# Altium PCB P05_ECG.PcbDoc
Units mm, origin at the board's own origin, x right, y up, seen from the top; angles counter-clockwise.
Board outline 80 x 55 mm, 2 copper layers (Top Layer, Bottom Layer); 91 components, 60 nets, 308 pads, 167 vias.
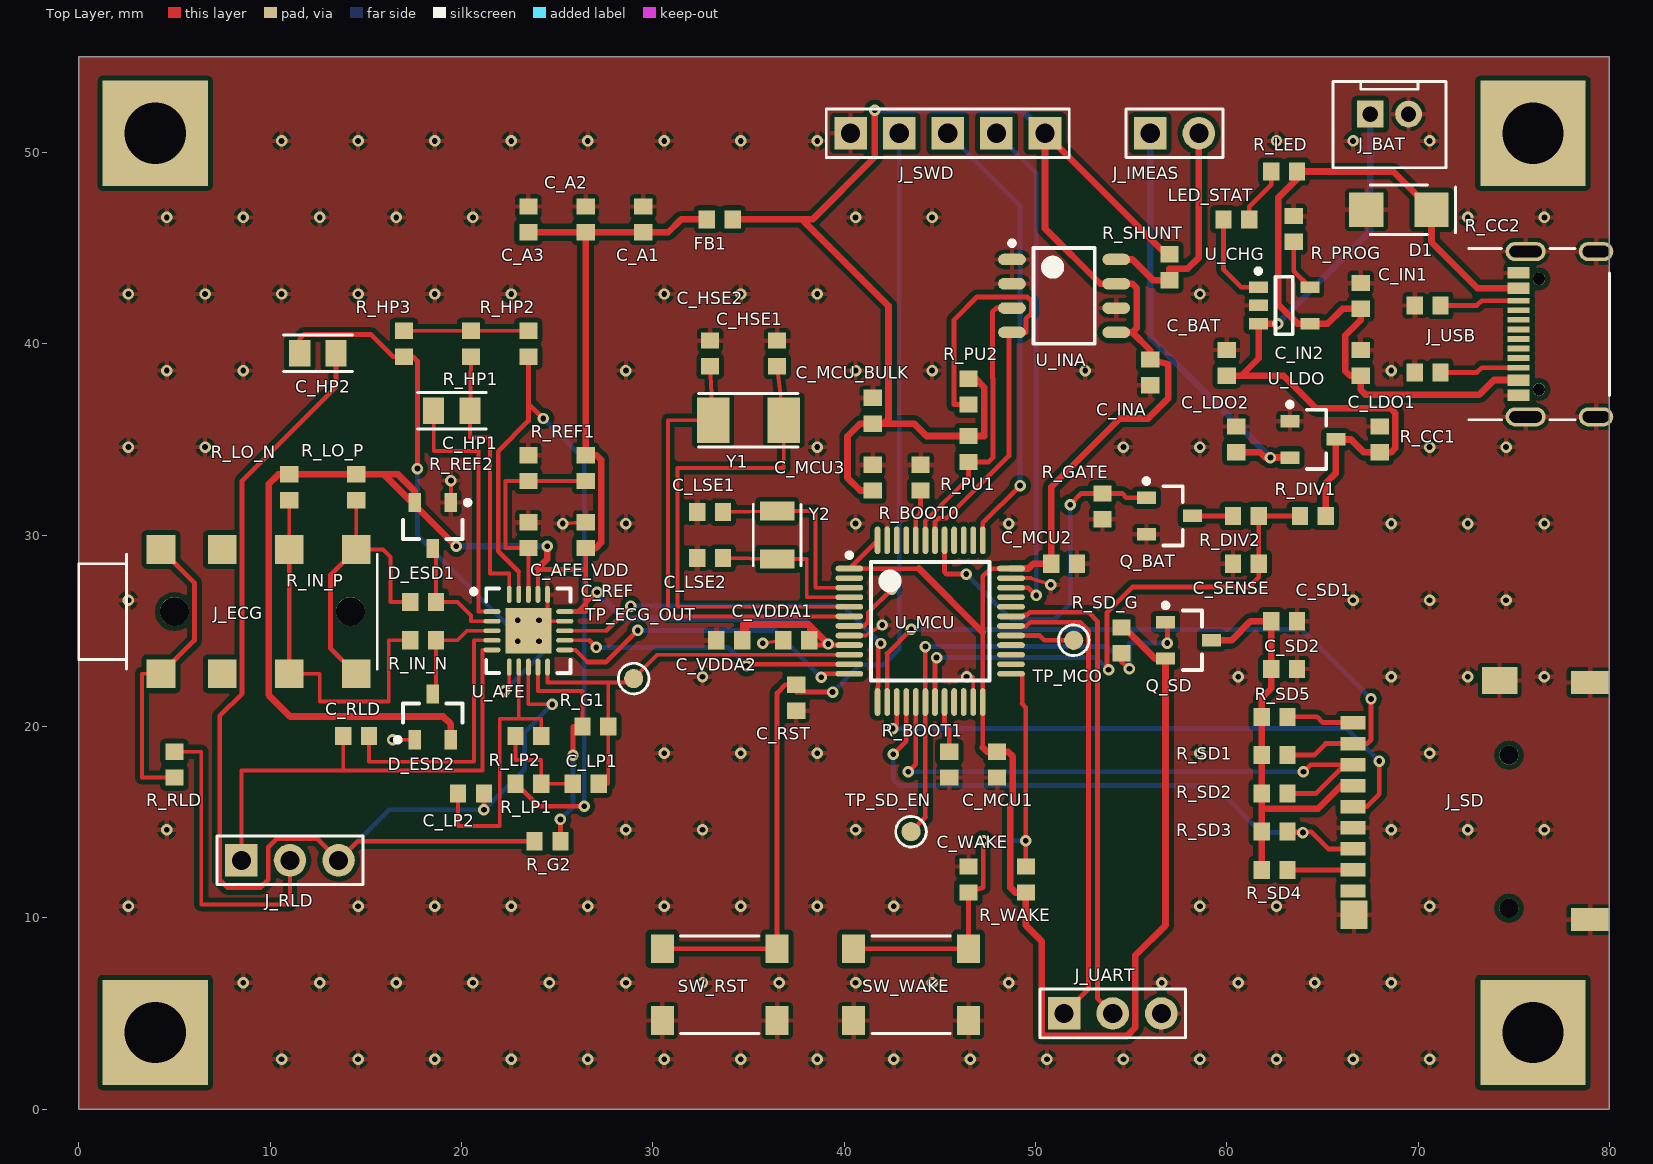
[diagram p0: Top Layer view]
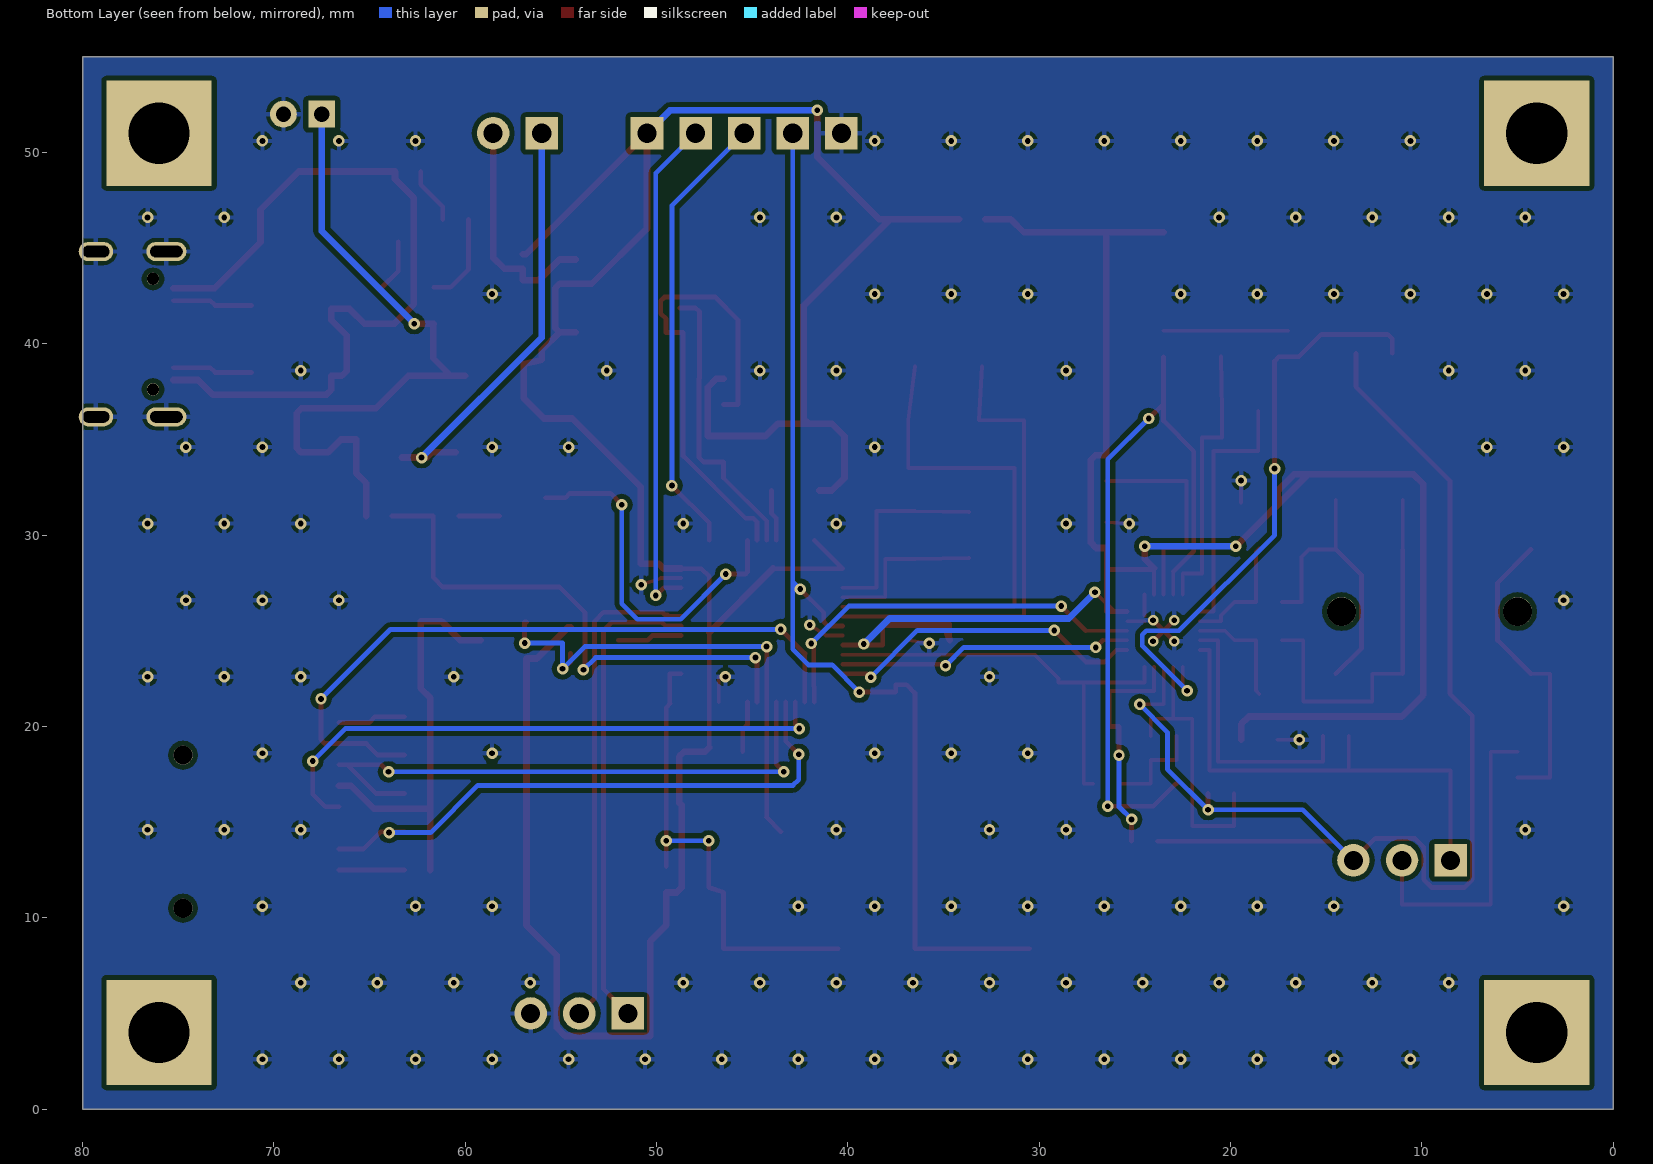
[diagram p1: Bottom Layer view, seen from below]

## Layer stack, top to bottom
Top Solder: solder mask 0.0102, Solder Resist, Dk 3.5
Top Layer: signal copper 0.0356
Dielectric 1: dielectric 0.32, FR-4, Dk 4.8
Bottom Layer: signal copper 0.0356
Bottom Solder: solder mask 0.0102, Solder Resist, Dk 3.5

## Board outline
0,0 80,0 80,55 0,55

## Design rules (kind name [scope] priority, off if disabled: settings)
Clearance [All] p1: gap=0.15 ignorepadtopadclearanceinfootprint=TRUE except(0: Arc-Hole Track-Hole SMDPad-Hole THPad-Hole Via-Hole Fill-Hole Poly-Hole Region-Hole Text-Hole; 0.25: Arc-Fill Arc-Poly Arc-Region Track-Fill Track-Poly Track-Region SMDPad-Fill SMDPad-Poly SMDPad-Region THPad-Fill THPad-Poly THPad-Region Via-Fill Via-Poly Via-Region Fill-Fill Fill-Poly Fill-Region Poly-Poly Poly-Region Region-Region)
ComponentClearance [All] p1: gap=0.2 collisioncheckmode=3 verticalgap=0.2 showdistances=FALSE
HoleSize [All] p1: absolutevalues=TRUE maxlimit=4 minlimit=0.3 maxpercent=80.000 minpercent=20.000
MinimumSolderMaskSliver [All] p1: minsoldermaskwidth=0.045
PolygonConnect [All] p1: connectstyle=Relief reliefconductorwidth=0.25 reliefentries=4 polygonreliefangle="90 Angle" airgapwidth=0.2
RoutingVias [All] p1: holewidth=0.3 width=0.6 viastyle="Through Hole" minholewidth=0.3 minwidth=0.6 maxholewidth=0.5 maxwidth=1
SilkToSilkClearance [All] p1: silktosilkclearance=0.12
SilkToSolderMaskClearance [IsPad] p1: minsilkscreentomaskgap=0.1 clearancetoexposedcopper=TRUE
SolderMaskExpansion [All] p1: expansion=0.05
Width Width_Power [InNet('VBUS') OR InNet('VBAT') OR InNet('3V3_PRE') OR InNet('3V3_IN') OR InNet('3V3_MAIN') OR InNet('3V3_SD') OR InNet('VDDA') OR InNet('GND')] p1: maxlimit=1 minlimit=0.2 preferedwidth=0.35 minimp=50.000000 maximp=50.000000 favimp=50.000000
Width [All] p2: maxlimit=1 minlimit=0.15 preferedwidth=0.25 minimp=50.000000 maximp=50.000000 favimp=50.000000
25 further rules are at their usual default settings.

## Components (designator, comment, footprint, x,y, rotation, side; value= is the part's Value field where it differs from the comment)
C_A1 "1uF" CHIP_0603 29.5,46.5 r90 top
C_A2 "100nF" CHIP_0603 26.5,46.5 r90 top
C_A3 "10nF" CHIP_0603 23.5,46.5 r90 top
C_AFE_VDD "100nF" CHIP_0603 26.5,30 r270 top
C_BAT "4.7uF" CHIP_0603 60,39 r90 top
C_HP1 "0.33uF" CAP_0805 19.5,36.5 r0 top
C_HP2 "0.33uF" CAP_0805 12.5,39.5 r0 top
C_HSE1 "20pF C0G" CHIP_0603 36.5,39.5 r90 top
C_HSE2 "20pF C0G" CHIP_0603 33,39.5 r90 top
C_IN1 "4.7uF" CHIP_0603 67,42.5 r90 top
C_IN2 "100nF" CHIP_0603 67,39 r90 top
C_INA "100nF" CHIP_0603 56,38.5 r270 top
C_LDO1 "1uF" CHIP_0603 68,35 r90 top
C_LDO2 "1uF" CHIP_0603 60.5,35 r90 top
C_LP1 "1.5nF" CHIP_0603 26.5,17 r0 top
C_LP2 "10nF" CHIP_0603 20.5,16.5 r0 top
C_LSE1 "10pF C0G" CHIP_0603 33,31.2 r180 top
C_LSE2 "10pF C0G" CHIP_0603 33,28.8 r0 top
C_MCU1 "100nF" CHIP_0603 48,18 r270 top
C_MCU2 "100nF" CHIP_0603 51.5,28.5 r0 top
C_MCU3 "100nF" CHIP_0603 41.5,33 r90 top
C_MCU_BULK "4.7uF" CHIP_0603 41.5,36.5 r90 top
C_REF "100nF" CHIP_0603 23.5,30 r90 top
C_RLD "1nF" CHIP_0603 14.5,19.5 r0 top
C_RST "100nF" CHIP_0603 37.5,21.5 r270 top
C_SD1 "4.7uF" CHIP_0603 63,25.5 r0 top
C_SD2 "100nF" CHIP_0603 63,23 r0 top
C_SENSE "100nF" CHIP_0603 61,28.5 r0 top
C_VDDA1 "100nF" CHIP_0603 37.5,24.5 r180 top
C_VDDA2 "1uF" CHIP_0603 34,24.5 r180 top
C_WAKE "100nF" CHIP_0603 46.5,12 r270 top
D1 "SMAJ5.0A" DIODE_SMA_DO214AC 69,47 r180 top
D_ESD1 "BAV199" SOT23_3 18.5,30.5 r270 top
D_ESD2 "BAV199" SOT23_3 18.5,20.5 r90 top
FB1 "FB 600R@100MHz" CHIP_0603 33.5,46.5 r180 top
J_BAT "BAT_CONN_2P" JST_B2B-PH-K-S 68.5,52 r0 top
J_ECG "PJ-313E" JACK_3.5MM_PJ313E 2.5,26 r90 top
J_IMEAS "HEADER_1X2" HDR_1X2_P2.54 56,51 r0 top
J_RLD "HEADER_1X3" HDR_1X3_P2.54 8.5,13 r0 top
J_SD "TF-01A" TF-01A 66.6,10.5 r90 top
J_SWD "HEADER_SWD_5P" HDR_1X5_P2.54 50.5,51 r180 top
J_UART "HEADER_1X3" HDR_1X3_P2.54 51.5,5 r0 top
J_USB "USB_C_16P_2MD073" USB_C_16P_2MD073 80,40.5 r90 top
LED_STAT "RED" CHIP_0603 60.5,46.5 r0 top
Q_BAT "2N7002" SOT23_3 57,31 r0 top
Q_SD "AO3401" SOT23_3 58,24.5 r0 top
R_BOOT0 "10K" CHIP_0603 44,33 r90 top
R_BOOT1 "10K" CHIP_0603 45.5,18 r270 top
R_CC1 "5.1k" CHIP_0603 70.5,38.5 r180 top
R_CC2 "5.1k" CHIP_0603 70.5,42 r180 top
R_DIV1 "100K" CHIP_0603 64.5,31 r0 top
R_DIV2 "100k" CHIP_0603 61,31 r0 top
R_G1 "1M" CHIP_0603 27,20 r180 top
R_G2 "100K" CHIP_0603 24.5,14 r180 top
R_GATE "100k" CHIP_0603 53.5,31.5 r90 top
R_HP1 "10M" CHIP_0603 20.5,40 r270 top
R_HP2 "10M" CHIP_0603 23.5,40 r90 top
R_HP3 "1.4M" CHIP_0603 17,40 r270 top
R_IN_N "180K" CHIP_0603 18,24.5 r0 top
R_IN_P "180K" CHIP_0603 18,26.5 r0 top
R_LED "1K" CHIP_0603 63,49 r180 top
R_LO_N "10M" CHIP_0603 11,32.5 r90 top
R_LO_P "10M" CHIP_0603 14.5,32.5 r90 top
R_LP1 "1M" CHIP_0603 23.5,17 r0 top
R_LP2 "1M" CHIP_0603 23.5,19.5 r0 top
R_PROG "4.7K" CHIP_0603 63.5,46 r270 top
R_PU1 "4.7K" CHIP_0603 46.5,34.5 r90 top
R_PU2 "4.7K" CHIP_0603 46.5,37.5 r90 top
R_REF1 "10M" CHIP_0603 26.5,33.5 r90 top
R_REF2 "10M" CHIP_0603 23.5,33.5 r90 top
R_RLD "360K" CHIP_0603 5,18 r90 top
R_SD1 "47K" CHIP_0603 62.5,18.5 r180 top
R_SD2 "47K" CHIP_0603 62.5,16.5 r0 top
R_SD3 "47K" CHIP_0603 62.5,14.5 r0 top
R_SD4 "47K" CHIP_0603 62.5,12.5 r0 top
R_SD5 "47K" CHIP_0603 62.5,20.5 r0 top
R_SD_G "100K" CHIP_0603 54.5,24.5 r90 top
R_SHUNT "0.1R 1%" CHIP_0603 57,44 r90 top
R_WAKE "100K" CHIP_0603 49.5,12 r90 top
SW_RST "SW_PUSH_4P" SW_SMD_TS1187A 33.5,6.5 r0 top
SW_WAKE "SW_PUSH_4P" SW_SMD_TS1187A 43.5,6.5 r0 top
TP_ECG_OUT "TESTPOINT" TESTPOINT_1MM 29,22.5 r0 top
TP_MCO "TESTPOINT" TESTPOINT_1MM 52,24.5 r0 top
TP_SD_EN "TESTPOINT" TESTPOINT_1MM 43.5,14.5 r0 top
U_AFE "AD8232" LFCSP20_4X4_P0.5 23.5,25 r0 top
U_CHG "MCP73831" SOT23_5 63,42 r0 top
U_INA "INA219AIDR" SOIC8_3.9x4.9 51.5,42.5 r0 top
U_LDO "MCP1700-3.3V" SOT23_3 64.5,35 r0 top
U_MCU "STM32F103C8T6" LQFP48_7x7_P0.5 44.5,25.5 r0 top
Y1 "8MHz" XTAL_5032_2P 35,36 r180 top
Y2 "32.768kHz" XTAL_3215 36.5,30 r270 top

## Footprints (in the part's own frame and the unit in brackets; to place one, negate y for a bottom-side part, rotate by r counter-clockwise, add the part's x,y. Pads: shape width x height; smd on the part's side, far side on the other; paste and mask are expansions set on the pad)
CAP_0805 [mm] "Chip Capacitor 0805 (2012 metric)"
  rect 1.1x1.4 smd: 1(-0.95,0) 2(0.95,0)
  silkscreen extent -1.8,-0.95 1.8,0.95
CHIP_0603 [mm] "Chip 0603 (1608 metric), dung chung R, C, ferrite bead"
  rect 0.85x0.95 smd: 1(-0.675,0) 2(0.675,0)
  body extent -0.85,-0.45 0.85,0.45, height 0.8
DIODE_SMA_DO214AC [mm] "TVS Diode SMA DO-214AC"
  rect 1.8x1.8 smd: 1(-1.7,0) 2(1.7,0)
  silkscreen extent -2.95,-1.3 1.5,1.3
HDR_1X2_P2.54 [mm] "Header 1x2 Pin Pitch 2.54mm Through-Hole"
  rect 1.7x1.7 hole 1: 1(0,0)
  round 1.7 hole 1: 2(2.54,0)
  silkscreen extent -1.27,-1.27 3.81,1.27
HDR_1X3_P2.54 [mm] "Header 1x3 Pin Pitch 2.54mm Through-Hole"
  rect 1.7x1.7 hole 1: 1(0,0)
  round 1.7 hole 1: 2(2.54,0) 3(5.08,0)
  silkscreen extent -1.27,-1.27 6.35,1.27
HDR_1X5_P2.54 [mm] "Header 1x5 Pin Pitch 2.54mm Through-Hole (SWD)"
  rect 1.7x1.7 hole 1: 1(0,0) 2(2.54,0) 3(5.08,0) 4(7.62,0) 5(10.16,0)
  silkscreen extent -1.27,-1.27 11.43,1.27
JACK_3.5MM_PJ313E [mm] "3.5mm SMD Audio/ECG Jack PJ-313E"
  round 1.5 hole 1.5 unplated: 0(0,-2.5) 0(0,-11.7)
  rect 1.5x1.5 smd: 1(-3.25,-1.8) 1(3.25,-1.8) 2(-3.25,-12) 2(3.25,-12) 3(-3.25,-8.5) 3(3.25,-8.5) 4(-3.25,-5) 4(3.25,-5)
  silkscreen extent -3,-13.1 3,2.5, body extent -3,-12.15 6.9,0, height 5
JST_B2B-PH-K-S [mm] "JST PH 2.0mm Pitch 2-Pin Header B2B-PH-K-S"
  rect 1.4x1.4 hole 0.8: 1(-1,0)
  round 1.4 hole 0.8: 2(1,0)
  silkscreen extent -2.95,-2.8 2.95,1.7
LFCSP20_4X4_P0.5 [mm] "LFCSP20, 4x4mm body, pitch 0.5mm, exposed pad, AD8232"
  oval 0.9x0.25 smd: 1(-1.9,1) 2(-1.9,0.5) 3(-1.9,0) 4(-1.9,-0.5) 5(-1.9,-1) 11(1.9,-1) 12(1.9,-0.5) 13(1.9,0) 14(1.9,0.5) 15(1.9,1)
  oval 0.25x0.9 smd: 6(-1,-1.9) 7(-0.5,-1.9) 8(0,-1.9) 9(0.5,-1.9) 10(1,-1.9) 16(1,1.9) 17(0.5,1.9) 18(0,1.9) 19(-0.5,1.9) 20(-1,1.9)
  rect 2.4x2.4 smd: 21(0,0)
  silkscreen extent -2.97,-2.2 2.2,2.2, body extent -2.05,-2.05 2.05,2.05, height 0.8
LQFP48_7x7_P0.5 [mm] "LQFP48, 7x7mm body, pitch 0.5mm, STM32F103C8T6"
  oval 1.45x0.3 smd: 1(-4.225,2.75) 2(-4.225,2.25) 3(-4.225,1.75) 4(-4.225,1.25) 5(-4.225,0.75) 6(-4.225,0.25) 7(-4.225,-0.25) 8(-4.225,-0.75) 9(-4.225,-1.25) 10(-4.225,-1.75) 11(-4.225,-2.25) 12(-4.225,-2.75) 25(4.225,-2.75) 26(4.225,-2.25) 27(4.225,-1.75) 28(4.225,-1.25) 29(4.225,-0.75) 30(4.225,-0.25) 31(4.225,0.25) 32(4.225,0.75) 33(4.225,1.25) 34(4.225,1.75) 35(4.225,2.25) 36(4.225,2.75)
  oval 0.3x1.45 smd: 13(-2.75,-4.225) 14(-2.25,-4.225) 15(-1.75,-4.225) 16(-1.25,-4.225) 17(-0.75,-4.225) 18(-0.25,-4.225) 19(0.25,-4.225) 20(0.75,-4.225) 21(1.25,-4.225) 22(1.75,-4.225) 23(2.25,-4.225) 24(2.75,-4.225) 37(2.75,4.225) 38(2.25,4.225) 39(1.75,4.225) 40(1.25,4.225) 41(0.75,4.225) 42(0.25,4.225) 43(-0.25,4.225) 44(-0.75,4.225) 45(-1.25,4.225) 46(-1.75,4.225) 47(-2.25,4.225) 48(-2.75,4.225)
  silkscreen extent -4.35,-3.1 3.1,3.57, body extent -3.5,-3.5 3.5,3.5, height 1.6
SOIC8_3.9x4.9 [mm] "SOIC-8, 3.9x4.9mm body, pitch 1.27mm, INA219"
  oval 1.45x0.6 smd: 1(-2.725,1.905) 2(-2.725,0.635) 3(-2.725,-0.635) 4(-2.725,-1.905) 5(2.725,-1.905) 6(2.725,-0.635) 7(2.725,0.635) 8(2.725,1.905)
  silkscreen extent -2.85,-2.5 1.6,2.88, body extent -2,-2.5 2,2.5, height 1.75
SOT23_3 [mm] "SOT23, 3-Leads, Body 2.86x2.37mm, Pitch 0.95mm, IPC Medium Density"
  rect 1x0.65 smd: 1(-1.2,0.95) 2(-1.2,-0.95) 3(1.2,0)
  silkscreen extent -1.32,-1.55 0.7,1.95, body extent -0.7,-1.52 0.7,1.53, height 1.12
SOT23_5 [mm] "SOT-23-5, pitch 0.95mm, MCP73831"
  rect 1x0.6 smd: 1(-1.35,0.95) 2(-1.35,0) 3(-1.35,-0.95) 4(1.35,-0.95) 5(1.35,0.95)
  silkscreen extent -1.47,-1.5 0.45,1.92, body extent -0.85,-1.5 0.85,1.5, height 1.45
SW_SMD_TS1187A [mm] "Tactile Switch SMD 5.1x5.1mm TS-1187A"
  rect 1.2x1.5 smd: 1(-3,1.875) 2(3,1.875) 3(-3,-1.875) 4(3,-1.875)
  silkscreen extent -2.05,-2.55 2.05,2.55
TESTPOINT_1MM [mm] "SMD Test Point Pad 1.0mm Round"
  round 1 smd: 1(0,0)
  silkscreen extent -0.8,-0.8 0.8,0.8
TF-01A [mm] "Height = 1.90mm, Description = MicroSD Card Socket Push-Push TF-01A"
  round 1 hole 1 unplated: 0(0,-8.15) 0(8,-8.15)
  rect 0.7x1.3 smd: 1(9.7,0) 2(8.6,0) 3(7.5,0) 4(6.4,0) 5(5.3,0) 6(4.2,0) 7(3.1,0) 8(2,0) 9(0.9,0)
  rect 1.2x2 smd: 10(-0.6,-12.38) 10(11.8,-12.38)
  rect 1.5x1.4 smd: 10(-0.35,-0.05)
  rect 1.4x1.85 smd: 10(11.9,-7.66)
USB_C_16P_2MD073 [mm] "USB Type-C 16-Pin SMD SHOUHAN 2MD(073)"
  round 0.65 hole 0.65 unplated: 0(-2.89,3.68) 0(2.89,3.68)
  rect 0.6x1.15 smd: 1(-3.2,4.745) 2(-2.4,4.745) 11(2.4,4.745) 12(3.2,4.745)
  rect 0.3x1.15 smd: 3(-1.75,4.745) 4(-1.25,4.745) 5(-0.75,4.745) 6(-0.25,4.745) 7(0.25,4.745) 8(0.75,4.745) 9(1.25,4.745) 10(1.75,4.745)
  oval 1x1.8 hole 0.6 slot 1.4 at 90 deg: 13(-4.32,0.7) 13(4.32,0.7)
  oval 1x2.1 hole 0.6 slot 1.7 at 90 deg: 13(-4.32,4.38) 13(4.32,4.38)
  silkscreen extent -4.47,0 4.47,7.35
XTAL_3215 [mm] "Epson FC-135R 32.768kHz 3.2x1.5mm"
  rect 1x1.8 smd: 1(-1.25,0) 2(1.25,0)
  silkscreen extent -1.6,-1.25 1.6,1.25, body extent -1.6,-0.75 1.6,0.75, height 0.8
XTAL_5032_2P [mm] "SMD Crystal 5.0x3.2mm 2-Pad YSX530GA"
  rect 1.7x2.4 smd: 1(-1.85,0) 2(1.85,0)
  silkscreen extent -2.6,-1.4 2.6,1.4

## Part data
C_A1 C_A2 C_A3 C_AFE_VDD C_BAT C_HSE1 C_HSE2 C_IN1 C_IN2 C_INA C_LDO1 C_LDO2 C_LP1 C_LP2 C_LSE1 C_LSE2 C_MCU1 C_MCU2 C_MCU3 C_MCU_BULK C_REF C_RLD C_RST C_SD1 C_SD2 C_SENSE C_VDDA1 C_VDDA2 C_WAKE: library part C_0603, "C_0603"
C_HP1 C_HP2: library part C_0805, "Capacitor 0805 C0G/Film for HPF filter"
D1: "DIODE_SMA_DO214AC"
FB1: library part FB_0603, "FB_0603"
J_ECG: "3.5mm SMD Audio/ECG Jack"
LED_STAT: library part LED_0603, "LED_0603"
Q_BAT: "N-Channel MOSFET 60V 0.3A SOT-23"
R_BOOT0 R_BOOT1 R_CC1 R_CC2 R_DIV1 R_DIV2 R_G1 R_G2 R_GATE R_HP1 R_HP2 R_HP3 R_IN_N R_IN_P R_LED R_LO_N R_LO_P R_LP1 R_LP2 R_PROG R_PU1 R_PU2 R_REF1 R_REF2 R_RLD R_SD1 R_SD2 R_SD3 R_SD4 R_SD5 R_SD_G R_WAKE: library part R_0603, "R_0603"
R_SHUNT: library part R_SHUNT_0R1, "Current Sense Resistor 0.1 Ohm 1% 0603"
U_INA: library part INA219, "INA219"
U_LDO: library part MCP1700, "LDO 3.3V 250mA, Iq 1.6uA."
Y1: library part XTAL_8MHZ, "XTAL_8MHZ"
Y2: library part XTAL_32K768, "XTAL_32K768"

## Free pads (board coordinates)
  rect 5.5x5.5 hole 3.2: MH1(4,4) MH2(4,51) MH3(76,51) MH4(76,4)

## Via types
v1: diameter 0.6, hole 0.3, Top Layer to Bottom Layer, 163 vias
v2: diameter 0.55, hole 0.3, Top Layer to Bottom Layer, 4 vias

## Nets (pads, with @x,y where several pads share a name; then routed paths per layer and width w, separated by ;. In a path a pad name is that pad's centre, name@x,y a point inside that pad or via, vN(x,y) a via of type N, cw(c..) or ccw(c..) an arc to the next point about the centre after c; other vN are vias at no path point)
3V3_IN: J_IMEAS.2 R_SHUNT.1 U_INA.8 | length 12.1
  Top Layer w0.35: U_INA.8 55.067,44.405 56.147,43.325 R_SHUNT.1 57,43.917 57.956,43.917 58.54,44.501 J_IMEAS.2
3V3_MAIN: C_INA.1 C_MCU1.1 C_MCU2.1 C_MCU3.1 C_MCU_BULK.1 FB1.1 J_SWD.1 Q_SD.2 R_PU1.2 R_PU2.2 R_SD_G.2 R_SHUNT.2 R_WAKE.1 U_INA.5 U_INA.7 U_MCU.1 U_MCU.24 U_MCU.36 U_MCU.48 | length 156.9
  Top Layer w0.24: U_MCU.48 U_MCU.1 43.917,28.25 ; 47.25,18.898 U_MCU.24 47.25,24.917 47.25,27.838 47.662,28.25 U_MCU.36
  Top Layer w0.35: FB1.1 37.795,46.5 ; C_MCU3.1 40.843,32.325 40.183,32.985 40.183,35.165 40.843,35.825 C_MCU_BULK.1 42.062,35.825 ; v1(41.605,52.197) 41.605,49.759 38.347,46.5 37.795,46.5 ; 43.917,28.25 47.25,24.917 ; R_PU2.2 46.87,38.175 47.32,37.725 47.32,35.175 R_PU1.2 44.313,35.175 43.663,35.825 42.062,35.825 ; 47.25,18.898 47.473,18.675 C_MCU1.1 48.565,18.675 48.819,18.421 48.819,16.027 48.692,15.9 48.692,11.582 48.949,11.325 R_WAKE.1 49.5,9.601 50.325,8.776 50.325,3.825 54.777,3.825 55.22,4.267 55.22,8.026 56.794,9.601 Q_SD.2@56.794,23.55 ; U_MCU.36 49.632,28.25 49.882,28.5 C_MCU2.1 50.825,32.512 54.407,36.093 55.88,36.093 56.947,37.16 56.947,38.921 C_INA.1 56,39.662 55.067,40.595 ; U_INA.5 55.067,40.595 ; R_SD_G.2 54.632,25.175 56.257,23.55 Q_SD.2@56.794,23.55 ; Q_SD.2 Q_SD.2@56.794,23.55 ; R_SHUNT.2 56.825,44.675 J_SWD.1 50.5,46.02 53.385,43.135 U_INA.7 55.067,43.135 55.296,42.906 55.296,40.824 55.067,40.595 ; 37.795,46.5 42.316,41.979 42.316,36.079 42.062,35.825
  Bottom Layer w0.35: v1(41.605,52.197) 49.303,52.197 J_SWD.1
3V3_PRE: C_LDO2.1 J_IMEAS.1 U_LDO.2 | length 22.5
  Top Layer w0.35: C_LDO2.1 61.747,34.325 62.022,34.05 v1(62.281,34.05) U_LDO.2
  Bottom Layer w0.35: J_IMEAS.1 56,40.331 v1(62.281,34.05)
3V3_SD: C_SD1.1 C_SD2.1 J_SD.4 Q_SD.3 R_SD1.2 R_SD2.1 R_SD3.1 R_SD4.1 R_SD5.1 | length 22
  Top Layer w0.35: Q_SD.3 60.249,24.5 61.249,25.5 C_SD1.1 C_SD2.1 62.325,21.988 61.825,21.488 R_SD5.1 R_SD1.2 R_SD2.1 61.825,15.697 ; R_SD4.1 R_SD3.1 61.825,15.697 ; J_SD.4 65.973,16.9 64.77,15.697 61.825,15.697
BAT_SENSE: C_SENSE.2 R_DIV1.1 R_DIV2.2 U_MCU.19 | length 28.7
  Top Layer w0.24: U_MCU.19 v1@44.75,23.516
  Top Layer w0.25: v1@44.75,23.516 v1(44.831,23.597) ; v1(53.823,22.962) 53.746,23.038 53.746,25.959 55.067,27.28 61.163,27.28 61.675,27.791 C_SENSE.2 R_DIV2.2 R_DIV1.1
  Bottom Layer w0.25: v1(44.831,23.597) 53.188,23.597 v1(53.823,22.962)
BAT_SENSE_EN: Q_BAT.1 R_GATE.2 U_MCU.41 | length 19.1
  Top Layer w0.24: 45.25,28.067 U_MCU.41
  Top Layer w0.25: 45.25,28.067 45.352,27.965 v1(46.38,27.965) ; v1(51.816,31.591) 52.4,32.175 R_GATE.2 54.534,32.175 54.759,31.95 Q_BAT.1
  Bottom Layer w0.25: v1(46.38,27.965) 48.743,25.603 51.003,25.603 51.816,26.416 v1(51.816,31.591)
DBG_RX: J_UART.2 U_MCU.31 | length 25.7
  Top Layer w0.24: U_MCU.31 49.428,25.75 49.428,25.832 49.581,25.832 49.708,25.959 52.781,25.959
  Top Layer w0.25: 52.781,25.959 53.242,25.498 53.242,5.798 J_UART.2
DBG_TX: J_UART.1 U_MCU.30 | length 24.8
  Top Layer w0.24: U_MCU.30 49.53,25.25 49.72,25.44 52.335,25.44
  Top Layer w0.25: J_UART.1 52.781,6.281 52.781,24.994 52.335,25.44
ECG_LOD_N: U_AFE.11 U_MCU.12 | length 16.9
  Top Layer w0.2: U_AFE.11 25.962,24 26.594,23.368
  Top Layer w0.24: v1(38.808,22.576) 38.982,22.75 U_MCU.12
  Top Layer w0.25: 26.594,23.368 27.559,23.368 v1(29.21,25.019)
  Bottom Layer w0.25: v1(29.21,25.019) 36.364,25.019 v1(38.808,22.576)
ECG_LOD_P: U_AFE.12 U_MCU.11 | length 15.5
  Top Layer w0.2: U_AFE.12 26.684,24.5
  Top Layer w0.24: v1@34.985,23.25 U_MCU.11
  Top Layer w0.25: 26.684,24.5 v1(27.054,24.13) ; v1(34.9,23.165) v1@34.985,23.25
  Bottom Layer w0.25: v1(27.054,24.13) 33.934,24.13 v1(34.9,23.165)
ECG_OUT: C_LP1.2 R_G1.1 TP_ECG_OUT.1 U_AFE.10 U_MCU.10 | length 23.1
  Top Layer w0.2: U_AFE.10 24.5,22.3 27.675,22.3 ; C_LP1.2 27.675,17 R_G1.1 27.675,22.3 ; U_MCU.10 30.25,23.75 TP_ECG_OUT.1 29,22.3 27.675,22.3
ECG_SDN: U_AFE.13 U_MCU.13 | length 21
  Top Layer w0.2: U_AFE.13 27.565,25
  Top Layer w0.24: U_MCU.13 41.75,22.061 41.78,22.091 v1@41.78,24.203
  Top Layer w0.25: 27.565,25 v1(28.854,26.289) ; v1@41.78,24.203 v1(41.91,24.333)
  Bottom Layer w0.25: v1(28.854,26.289) 39.954,26.289 v1(41.91,24.333)
GND: C_A1.2 C_A2.2 C_A3.2 C_AFE_VDD.1 C_BAT.2 C_HSE1.2 C_HSE2.2 C_IN1.2 C_IN2.2 C_INA.2 C_LDO1.2 C_LDO2.2 C_LSE1.2 C_LSE2.1 C_MCU1.2 C_MCU2.2 C_MCU3.2 C_MCU_BULK.2 C_REF.2 C_RST.2 C_SD1.2 C_SD2.2 C_SENSE.1 C_VDDA1.2 C_VDDA2.2 C_WAKE.1 D1.2 D_ESD1.1 D_ESD2.1 J_BAT.2 J_SD.6 J_SD.10 J_SWD.5 J_UART.3 J_USB.1 J_USB.12 J_USB.13 Q_BAT.2 R_BOOT0.2 R_BOOT1.2 R_CC1.2 R_CC2.2 R_GATE.1 R_PROG.1 R_REF2.2 SW_RST.3 SW_RST.4 SW_WAKE.3 SW_WAKE.4 U_AFE.14 U_AFE.16 U_AFE.21 U_CHG.2 U_INA.1 U_INA.2 U_INA.6 U_LDO.1 U_MCU.8 U_MCU.23 U_MCU.35 U_MCU.47 | length 15.4
  Top Layer w0.2: v1(16.4,19.3) D_ESD2.1 ; D_ESD1.1 v1(19.45,32.85) ; U_AFE.21@24.5,25.5 U_AFE.14 ; U_AFE.21@24.5,25.8 U_AFE.16 ; v1(25.3,30.6) C_AFE_VDD.1 ; v1(35.75,24.35) C_VDDA1.2 ; U_MCU.8 41.138,24.75 v1(42,25.3) ; v1(46.4,22.6) 46.75,22.6 U_MCU.23 ; U_MCU.35 49.762,27.75 v1(50.8,27.4)
  Top Layer w0.25: v2(22.95,24.45) U_AFE.21 ; v2(22.95,25.55) U_AFE.21 ; U_AFE.21@24.05,24.45 U_AFE.21 ; U_AFE.21@24.05,25.55 U_AFE.21
  other v1: 10.6,2.6 14.6,2.6 18.6,2.6 22.6,2.6 26.6,2.6 30.6,2.6 34.6,2.6 38.6,2.6 42.6,2.6 46.6,2.6 50.6,2.6 54.6,2.6 58.6,2.6 62.6,2.6 66.6,2.6 70.6,2.6 8.6,6.6 12.6,6.6 16.6,6.6 20.6,6.6 24.6,6.6 28.6,6.6 32.6,6.6 36.6,6.6 40.6,6.6 44.6,6.6 48.6,6.6 56.6,6.6 60.6,6.6 64.6,6.6 68.6,6.6 2.6,10.6 14.6,10.6 18.6,10.6 22.6,10.6 26.6,10.6 30.6,10.6 34.6,10.6 38.6,10.6 42.6,10.6 58.6,10.6 62.6,10.6 70.6,10.6 4.6,14.6 28.6,14.6 32.6,14.6 40.6,14.6 68.6,14.6 72.6,14.6 76.6,14.6 30.6,18.6 34.6,18.6 38.6,18.6 58.6,18.6 70.6,18.6 32.6,22.6 60.6,22.6 68.6,22.6 72.6,22.6 76.6,22.6 2.6,26.6 66.6,26.6 70.6,26.6 74.6,26.6 28.6,30.6 40.6,30.6 48.6,30.6 68.6,30.6 72.6,30.6 76.6,30.6 2.6,34.6 6.6,34.6 38.6,34.6 54.6,34.6 58.6,34.6 70.6,34.6 74.6,34.6 4.6,38.6 8.6,38.6 28.6,38.6 40.6,38.6 44.6,38.6 52.6,38.6 68.6,38.6 2.6,42.6 6.6,42.6 10.6,42.6 14.6,42.6 18.6,42.6 22.6,42.6 30.6,42.6 34.6,42.6 38.6,42.6 58.6,42.6 4.6,46.6 8.6,46.6 12.6,46.6 16.6,46.6 20.6,46.6 40.6,46.6 44.6,46.6 72.6,46.6 76.6,46.6 10.6,50.6 14.6,50.6 18.6,50.6 22.6,50.6 26.6,50.6 30.6,50.6 34.6,50.6 38.6,50.6 62.6,50.6 66.6,50.6 70.6,50.6
  other v2: 24.05,24.45 24.05,25.55
HP_MID: R_HP1.1 R_HP2.2 R_HP3.1 | length 6.5
  Top Layer w0.2: R_HP3.1 R_HP1.1 R_HP2.2
I2C1_SCL: R_PU2.1 U_INA.4 U_MCU.42 | length 25.2
  Top Layer w0.24: U_MCU.42 44.75,30.682 44.942,30.874 45.352,30.874 48.616,34.138
  Top Layer w0.25: R_PU2.1 45.745,36.825 45.745,41.25 46.939,42.443 49.581,42.443 49.784,42.24 49.784,41.58 49.505,41.3 49.505,40.595 U_INA.4 48.616,40.595 48.616,34.138
I2C1_SDA: R_PU1.1 U_INA.3 U_MCU.43 | length 15.1
  Top Layer w0.24: U_MCU.43 44.25,30.734 46.5,32.984
  Top Layer w0.25: 46.5,32.984 R_PU1.1 47.549,33.825 47.777,34.054 47.777,38.176 47.752,38.202 47.752,41.662 47.955,41.865 U_INA.3
J_ECG_1: J_ECG.1 R_RLD.1 | length 16.1
  Top Layer w0.2: J_ECG.1@4.3,22.75 3.3,22.75 3.3,17.325 R_RLD.1
  Top Layer w0.25: J_ECG.1@4.3,22.75 6.045,24.495 6.045,27.505 J_ECG.1@4.3,29.25
LP_MID: C_LP1.1 R_LP1.2 R_LP2.1 | length 5.5
  Top Layer w0.2: R_LP2.1 22.825,18.25 24.175,18.25 R_LP1.2 C_LP1.1
MCO_OUT: TP_MCO.1 U_MCU.29 | length 3.4
  Top Layer w0.24: U_MCU.29 50.216,24.75
  Top Layer w0.25: 50.216,24.75 50.466,24.5 TP_MCO.1
NetC_HSE1_1: C_HSE1.1 U_MCU.5 Y1.1 | length 27.1
  Top Layer w0.2: C_HSE1.1 Y1.1 36.85,33.5 31.3,33.5 31.3,26.25 U_MCU.5
NetC_HSE2_1: C_HSE2.1 U_MCU.6 Y1.2 | length 24.9
  Top Layer w0.2: C_HSE2.1 Y1.2 30.8,36 30.8,25.75 U_MCU.6
NetC_LSE1_1: C_LSE1.1 U_MCU.3 Y2.1 | length 10.6
  Top Layer w0.2: C_LSE1.1 Y2.1 38.5,31.25 38.5,27.25 U_MCU.3
NetC_LSE2_2: C_LSE2.2 U_MCU.4 Y2.2 | length 8.6
  Top Layer w0.2: C_LSE2.2 Y2.2 38.05,28.75 38.05,26.75 U_MCU.4
NetC_REF_1: C_REF.1 R_REF1.1 R_REF2.1 U_AFE.18 | length 11.3
  Top Layer w0.2: U_AFE.18 C_REF.1 22.3,29.325 22.3,32.825 R_REF2.1 R_REF1.1
NetC_RLD_1: C_RLD.1 J_RLD.1 U_AFE.5 | length 25.9
  Top Layer w0.2: J_RLD.1 8.5,17.7 13.825,17.7 ; C_RLD.1 13.825,17.7 ; U_AFE.5 21.1,24 21.1,17.7 13.825,17.7
NetC_RLD_2: C_RLD.2 U_AFE.4 | length 14.1
  Top Layer w0.2: C_RLD.2 15.175,18.15 20.65,18.15 20.65,24.5 U_AFE.4
NetJ_ECG_2: J_ECG.2 R_IN_P.1 R_LO_P.1 | length 15.5
  Top Layer w0.2: R_LO_P.1 14.5,29.25 15.9,29.25 16.3,28.85 16.3,26.5 R_IN_P.1
  Top Layer w0.25: J_ECG.2@14.5,22.75 13.157,24.093 13.157,27.907 J_ECG.2@14.5,29.25
NetJ_ECG_3: J_ECG.3 R_IN_N.1 R_LO_N.1 | length 20
  Top Layer w0.2: J_ECG.3@11,22.75 12.6,22.75 12.6,21.3 16.2,21.3 16.2,24.5 R_IN_N.1 ; J_ECG.3@11,29.25 R_LO_N.1
  Top Layer w0.25: J_ECG.3@11,22.75 J_ECG.3@11,29.25
NetJ_RLD_2: J_RLD.2 R_RLD.2 | length 16.3
  Top Layer w0.2: R_RLD.2 6.4,18.675 6.4,10.7 11.04,10.7 J_RLD.2
NetJ_SD_1: J_SD.1 R_SD5.2 | length 3.5
  Top Layer w0.25: R_SD5.2 64.719,20.5 65.019,20.2 J_SD.1
NetJ_SD_8: J_SD.8 R_SD4.2 | length 3.4
  Top Layer w0.25: R_SD4.2 J_SD.8
NetJ_USB_3: J_USB.3 R_CC1.1 | length 4.2
  Top Layer w0.25: R_CC1.1 73.076,38.5 73.326,38.75 J_USB.3
NetJ_USB_10: J_USB.10 R_CC2.1 | length 4.2
  Top Layer w0.25: R_CC2.1 73.076,42 73.326,42.25 J_USB.10
NetLED_STAT_1: LED_STAT.1 U_CHG.1 | length 4.8
  Top Layer w0.25: LED_STAT.1 59.825,43.882 60.757,42.95 U_CHG.1
NetLED_STAT_2: LED_STAT.2 R_LED.2 | length 3
  Top Layer w0.25: LED_STAT.2 61.175,47.168 62.325,48.318 R_LED.2
NetQ_BAT_3: Q_BAT.3 R_DIV2.1 | length 2.1
  Top Layer w0.25: Q_BAT.3 R_DIV2.1
NetR_BOOT0_1: R_BOOT0.1 U_MCU.44 | length 2.7
  Top Layer w0.25: U_MCU.44 43.75,30.886 44,31.136 R_BOOT0.1
NetR_BOOT1_1: R_BOOT1.1 U_MCU.20 | length 2.7
  Top Layer w0.25: U_MCU.20 45.25,20.087 45.5,19.837 R_BOOT1.1
NetR_PROG_2: R_PROG.2 U_CHG.5 | length 2.7
  Top Layer w0.25: R_PROG.2 63.5,43.8 U_CHG.5
NRST: C_RST.1 J_SWD.4 SW_RST.1 SW_RST.2 U_MCU.7 | length 58
  Top Layer w0.24: U_MCU.7 41.046,25.25 41.27,25.474 41.27,25.954 v1(42.494,27.178)
  Top Layer w0.25: SW_RST.1 SW_RST.2 36.5,21.742 36.933,22.175 C_RST.1 37.5,21.793 v1(39.395,21.793)
  Bottom Layer w0.25: v1(39.395,21.793) 40.815,23.213 42.062,23.213 42.88,24.03 42.88,27.564 ; v1(42.494,27.178) 42.88,27.564 ; J_SWD.4 42.88,27.564
SD_CS: J_SD.2 R_SD1.1 U_MCU.14 | length 36.7
  Top Layer w0.24: U_MCU.14 42.25,23.81
  Top Layer w0.25: 42.25,23.81 v1(43.51,25.07) ; R_SD1.1 64.567,18.5 65.167,19.1 J_SD.2 67.335,19.1 67.539,19.304 v1(67.539,21.438)
  Bottom Layer w0.25: v1(43.51,25.07) 63.906,25.07 v1(67.539,21.438)
SD_PWR_EN: Q_SD.1 R_SD_G.1 TP_SD_EN.1 U_MCU.18 | length 26.7
  Top Layer w0.24: 44.25,15.25 U_MCU.18 v1(44.25,24.174)
  Top Layer w0.25: TP_SD_EN.1 44.25,15.25 ; R_SD_G.1 54.5,23.368 54.856,23.012 v1(54.915,23.012) ; Q_SD.1 56.896,25.45 v1(56.896,24.359)
  Bottom Layer w0.25: v1(44.25,24.174) 53.754,24.174 v1(54.915,23.012) 54.915,24.359 v1(56.896,24.359)
SPI1_MISO: J_SD.7 R_SD3.2 U_MCU.16 | length 31.5
  Top Layer w0.24: 43.25,19.222 U_MCU.16
  Top Layer w0.25: v1(42.57,18.542) 43.25,19.222 ; v1(63.983,14.453) 63.175,14.453 R_SD3.2 64.414,14.5 65.314,13.6 J_SD.7
  Bottom Layer w0.25: v1(42.57,18.542) 42.57,17.221 42.875,16.916 59.334,16.916 61.798,14.453 v1(63.983,14.453)
SPI1_MOSI: J_SD.3 R_SD2.2 U_MCU.17 | length 30.8
  Top Layer w0.24: 43.75,18.02 U_MCU.17
  Top Layer w0.25: v1(43.358,17.628) 43.75,18.02 ; R_SD2.2 64.668,16.5 J_SD.3@66.168,18 ; v1(64.008,17.628) 64.38,18 J_SD.3@66.168,18 ; J_SD.3 J_SD.3@66.168,18
  Bottom Layer w0.25: v1(43.358,17.628) v1(64.008,17.628)
SPI1_SCK: J_SD.5 U_MCU.15 | length 31
  Top Layer w0.24: v1(42.545,19.888) 42.75,20.093 U_MCU.15
  Top Layer w0.25: J_SD.5 67.311,15.8 67.97,16.459 v1(67.97,18.186)
  Bottom Layer w0.25: v1(42.545,19.888) 66.269,19.888 v1(67.97,18.186)
SWCLK: J_SWD.3 U_MCU.37 | length 23.6
  Top Layer w0.24: U_MCU.37 47.25,30.638 v1(49.2,32.588)
  Bottom Layer w0.25: J_SWD.3 49.2,47.22 v1(49.2,32.588)
SWDIO: J_SWD.2 U_MCU.34 | length 26.5
  Top Layer w0.24: U_MCU.34 49.632,27.25 v1(50.038,26.844)
  Bottom Layer w0.25: J_SWD.2 50.038,48.922 v1(50.038,26.844)
U_AFE_1: C_HP1.1 U_AFE.1 | length 13.5
  Top Layer w0.2: C_HP1.1 18.55,34.4 20.9,34.4 20.9,26 U_AFE.1
U_AFE_2: D_ESD1.3 R_IN_P.2 U_AFE.2 | length 6.4
  Top Layer w0.2: D_ESD1.3 18.675,29.125 R_IN_P.2 19.8,26.5 20.5,25.8 20.5,25.5 U_AFE.2
U_AFE_3: D_ESD2.3 R_IN_N.2 U_AFE.3 | length 6
  Top Layer w0.2: D_ESD2.3 18.675,21.875 R_IN_N.2 19.8,24.5 20.3,25 U_AFE.3
U_AFE_6: C_HP2.1 R_HP3.2 U_AFE.6 | length 31
  Top Layer w0.2: 22.5,22.094 U_AFE.6
  Top Layer w0.25: C_HP2.1 11.55,40.252 11.786,40.488 15.265,40.488 16.428,39.325 R_HP3.2 17.475,39.325 17.704,39.096 v1(17.704,33.477) ; v1(22.276,21.869) 22.5,22.094
  Bottom Layer w0.25: v1(17.704,33.477) 17.704,29.997 22.701,25 24.403,25 24.613,24.79 24.613,24.206 v1(22.276,21.869)
U_AFE_7: C_LP2.1 R_LP2.2 U_AFE.7 | length 15.2
  Top Layer w0.2: C_LP2.1 19.825,14.8 22,14.8 22,20.4 23,20.4 ; U_AFE.7 23,20.4 ; R_LP2.2 24.175,20.4 23,20.4
U_AFE_9: R_G1.2 R_G2.1 U_AFE.9 | length 12.2
  Top Layer w0.2: U_AFE.9 24,21.85 26.325,21.85 R_G1.2
  Top Layer w0.25: R_G2.1 v1(25.175,15.138) ; v1(25.832,18.491) 25.832,20 R_G1.2
  Bottom Layer w0.25: v1(25.175,15.138) 25.832,15.795 v1(25.832,18.491)
U_AFE_19: R_HP2.1 R_LP1.1 U_AFE.19 | length 39.9
  Top Layer w0.2: U_AFE.19 23,28.079
  Top Layer w0.25: R_LP1.1 22.86,17 24.036,15.824 v1(26.416,15.824) ; 23,28.079 21.92,29.159 21.92,34.387 23.5,35.966 23.5,36.876 ; R_HP2.1 23.5,36.876 ; v1(24.282,36.093) 23.5,36.876
  Bottom Layer w0.25: v1(24.282,36.093) 26.416,33.96 v1(26.416,15.824)
U_AFE_20: C_HP1.2 R_HP1.2 U_AFE.20 | length 14.5
  Top Layer w0.2: R_HP1.2 C_HP1.2 20.45,35.1 21.5,35.1 21.5,28 22.5,28 U_AFE.20
VBAT: C_BAT.1 C_LDO1.1 J_BAT.1 R_DIV1.2 U_CHG.3 U_LDO.3 | length 36.2
  Top Layer w0.35: C_BAT.1 60.757,38.325 ; U_CHG.3 U_CHG.3@61.671,41.05 ; v1(62.662,41.05) U_CHG.3@61.671,41.05 ; R_DIV1.2 65.175,32.715 65.7,33.24 U_LDO.3 66.497,35 67.172,34.325 C_LDO1.1 68.59,34.325 68.809,34.544 68.809,36.373 68.555,36.627 64.668,36.627 62.97,38.325 60.757,38.325 ; 60.757,38.325 61.671,39.239 U_CHG.3@61.671,41.05
  Bottom Layer w0.35: v1(62.662,41.05) 67.5,45.888 J_BAT.1
VBUS: C_IN1.1 C_IN2.1 D1.1 J_USB.2 J_USB.11 R_LED.1 U_CHG.4 | length 41.4
  Top Layer w0.35: J_USB.2 73.965,38.1 73.203,37.338 67.254,37.338 67,37.592 C_IN2.1 66.446,38.325 66.192,38.579 66.192,40.437 67,41.244 C_IN1.1 66.053,41.825 65.278,41.05 U_CHG.4 63.7,41.05 62.687,42.062 62.687,47.625 63.675,48.613 R_LED.1 68.7,49 D1.1 70.7,45.302 73.102,42.9 J_USB.11
VDDA: C_A1.1 C_A2.1 C_A3.1 C_AFE_VDD.2 C_VDDA1.1 C_VDDA2.1 D_ESD1.2 D_ESD2.2 FB1.2 R_LO_N.2 R_LO_P.2 R_REF1.2 U_AFE.15 U_AFE.17 U_MCU.9 | length 106.3
  Top Layer w0.2: U_AFE.17 24,28.2 24,28.267 ; U_AFE.15 26.076,26 v1(27.089,27.013)
  Top Layer w0.25: 24,28.2 26.5,28.2 ; U_AFE.15 26.5,26 26.5,28.2 ; C_AFE_VDD.2 26.5,28.2 ; C_VDDA2.1 34.675,25.35 38.175,25.35 C_VDDA1.1 38.175,24.25 U_MCU.9
  Top Layer w0.35: D_ESD1.2 17.55,32.309 16.684,33.175 15.963,33.175 ; D_ESD2.2 19.45,20.117 19.044,20.523 11.049,20.523 9.925,21.647 9.925,32.658 10.442,33.175 R_LO_N.2 R_LO_P.2 15.963,33.175 ; v1(19.725,29.413) 15.963,33.175 ; C_A3.1 C_A2.1 ; 24,28.267 24.486,28.753 v1(24.486,29.413) ; C_AFE_VDD.2 27.026,29.325 27.305,29.604 27.305,33.934 27.064,34.175 R_REF1.2 C_A2.1 ; FB1.2 31.485,46.5 30.81,45.825 C_A1.1 C_A2.1 ; C_VDDA2.1 34.95,25.324 38.151,25.324 v1(39.167,24.308)
  Bottom Layer w0.35: v1(19.725,29.413) v1(24.486,29.413) ; v1(27.089,27.013) 28.458,25.644 37.831,25.644 v1(39.167,24.308)
VREF_1V65: C_HP2.2 C_LP2.2 J_RLD.3 R_G2.2 U_AFE.8 | length 69.3
  Top Layer w0.18: U_AFE.8 23.5,21.15 v1(24.75,21.15)
  Top Layer w0.25: C_HP2.2 13.45,37.758 8.534,32.842 8.534,21.717 7.366,20.549 7.366,11.989 7.772,11.582 9.5,11.582 9.906,11.989 9.906,13.691 10.363,14.148 12.432,14.148 J_RLD.3 14.58,14 R_G2.2 ; v1(21.175,15.646) C_LP2.2
  Bottom Layer w0.25: J_RLD.3 16.226,15.646 v1(21.175,15.646) ; v1@21.18,15.65 23.3,17.77 23.3,19.7 v1(24.75,21.15)
WAKE_BTN: C_WAKE.2 R_WAKE.2 SW_WAKE.1 SW_WAKE.2 U_MCU.25 | length 25.2
  Top Layer w0.24: U_MCU.25 49.301,22.75 49.301,21.184
  Top Layer w0.25: SW_WAKE.1 SW_WAKE.2 C_WAKE.2 47.269,11.582 v1(47.269,14.025) ; 49.301,21.184 49.5,20.985 v1(49.5,14.025) R_WAKE.2
  Bottom Layer w0.25: v1(47.269,14.025) v1(49.5,14.025)
pads on no net: J_ECG.0 J_ECG.4 J_SD.0 J_SD.9 J_USB.0 J_USB.4 J_USB.5 J_USB.6 J_USB.7 J_USB.8 J_USB.9 U_MCU.2 U_MCU.21 U_MCU.22 U_MCU.26 U_MCU.27 U_MCU.28 U_MCU.32 U_MCU.33 U_MCU.38 U_MCU.39 U_MCU.40 U_MCU.45 U_MCU.46

## Polygon pours and split planes (outlines as drawn)
GND on Bottom Layer "GND_BOT" (solid, remove dead copper, pour order 0): 0,0 80,0 80,55 0,55
GND on Top Layer "GND_BOT" (solid, remove dead copper, pour order 4): 0,0 80,0 80,55 0,55

## Keep-outs
Mechanical 1:
  the board outline again, w0.15

## Silkscreen, mask and mechanical layers (free items; w line width, h text height)
Mechanical 1:
  the board outline again, w0.15